# Altium PCB Whisper_pcb.PcbDoc (part 2 of 2)
Units mil, origin at the board's own origin, x right, y up, seen from the top; angles counter-clockwise.
Board outline 2755.91 x 3228.35 mil, 4 copper layers (Top Layer, GND, PWR, Bottom Layer), stack 23.756 mil thick; 209 components, 169 nets, 843 pads, 233 vias.
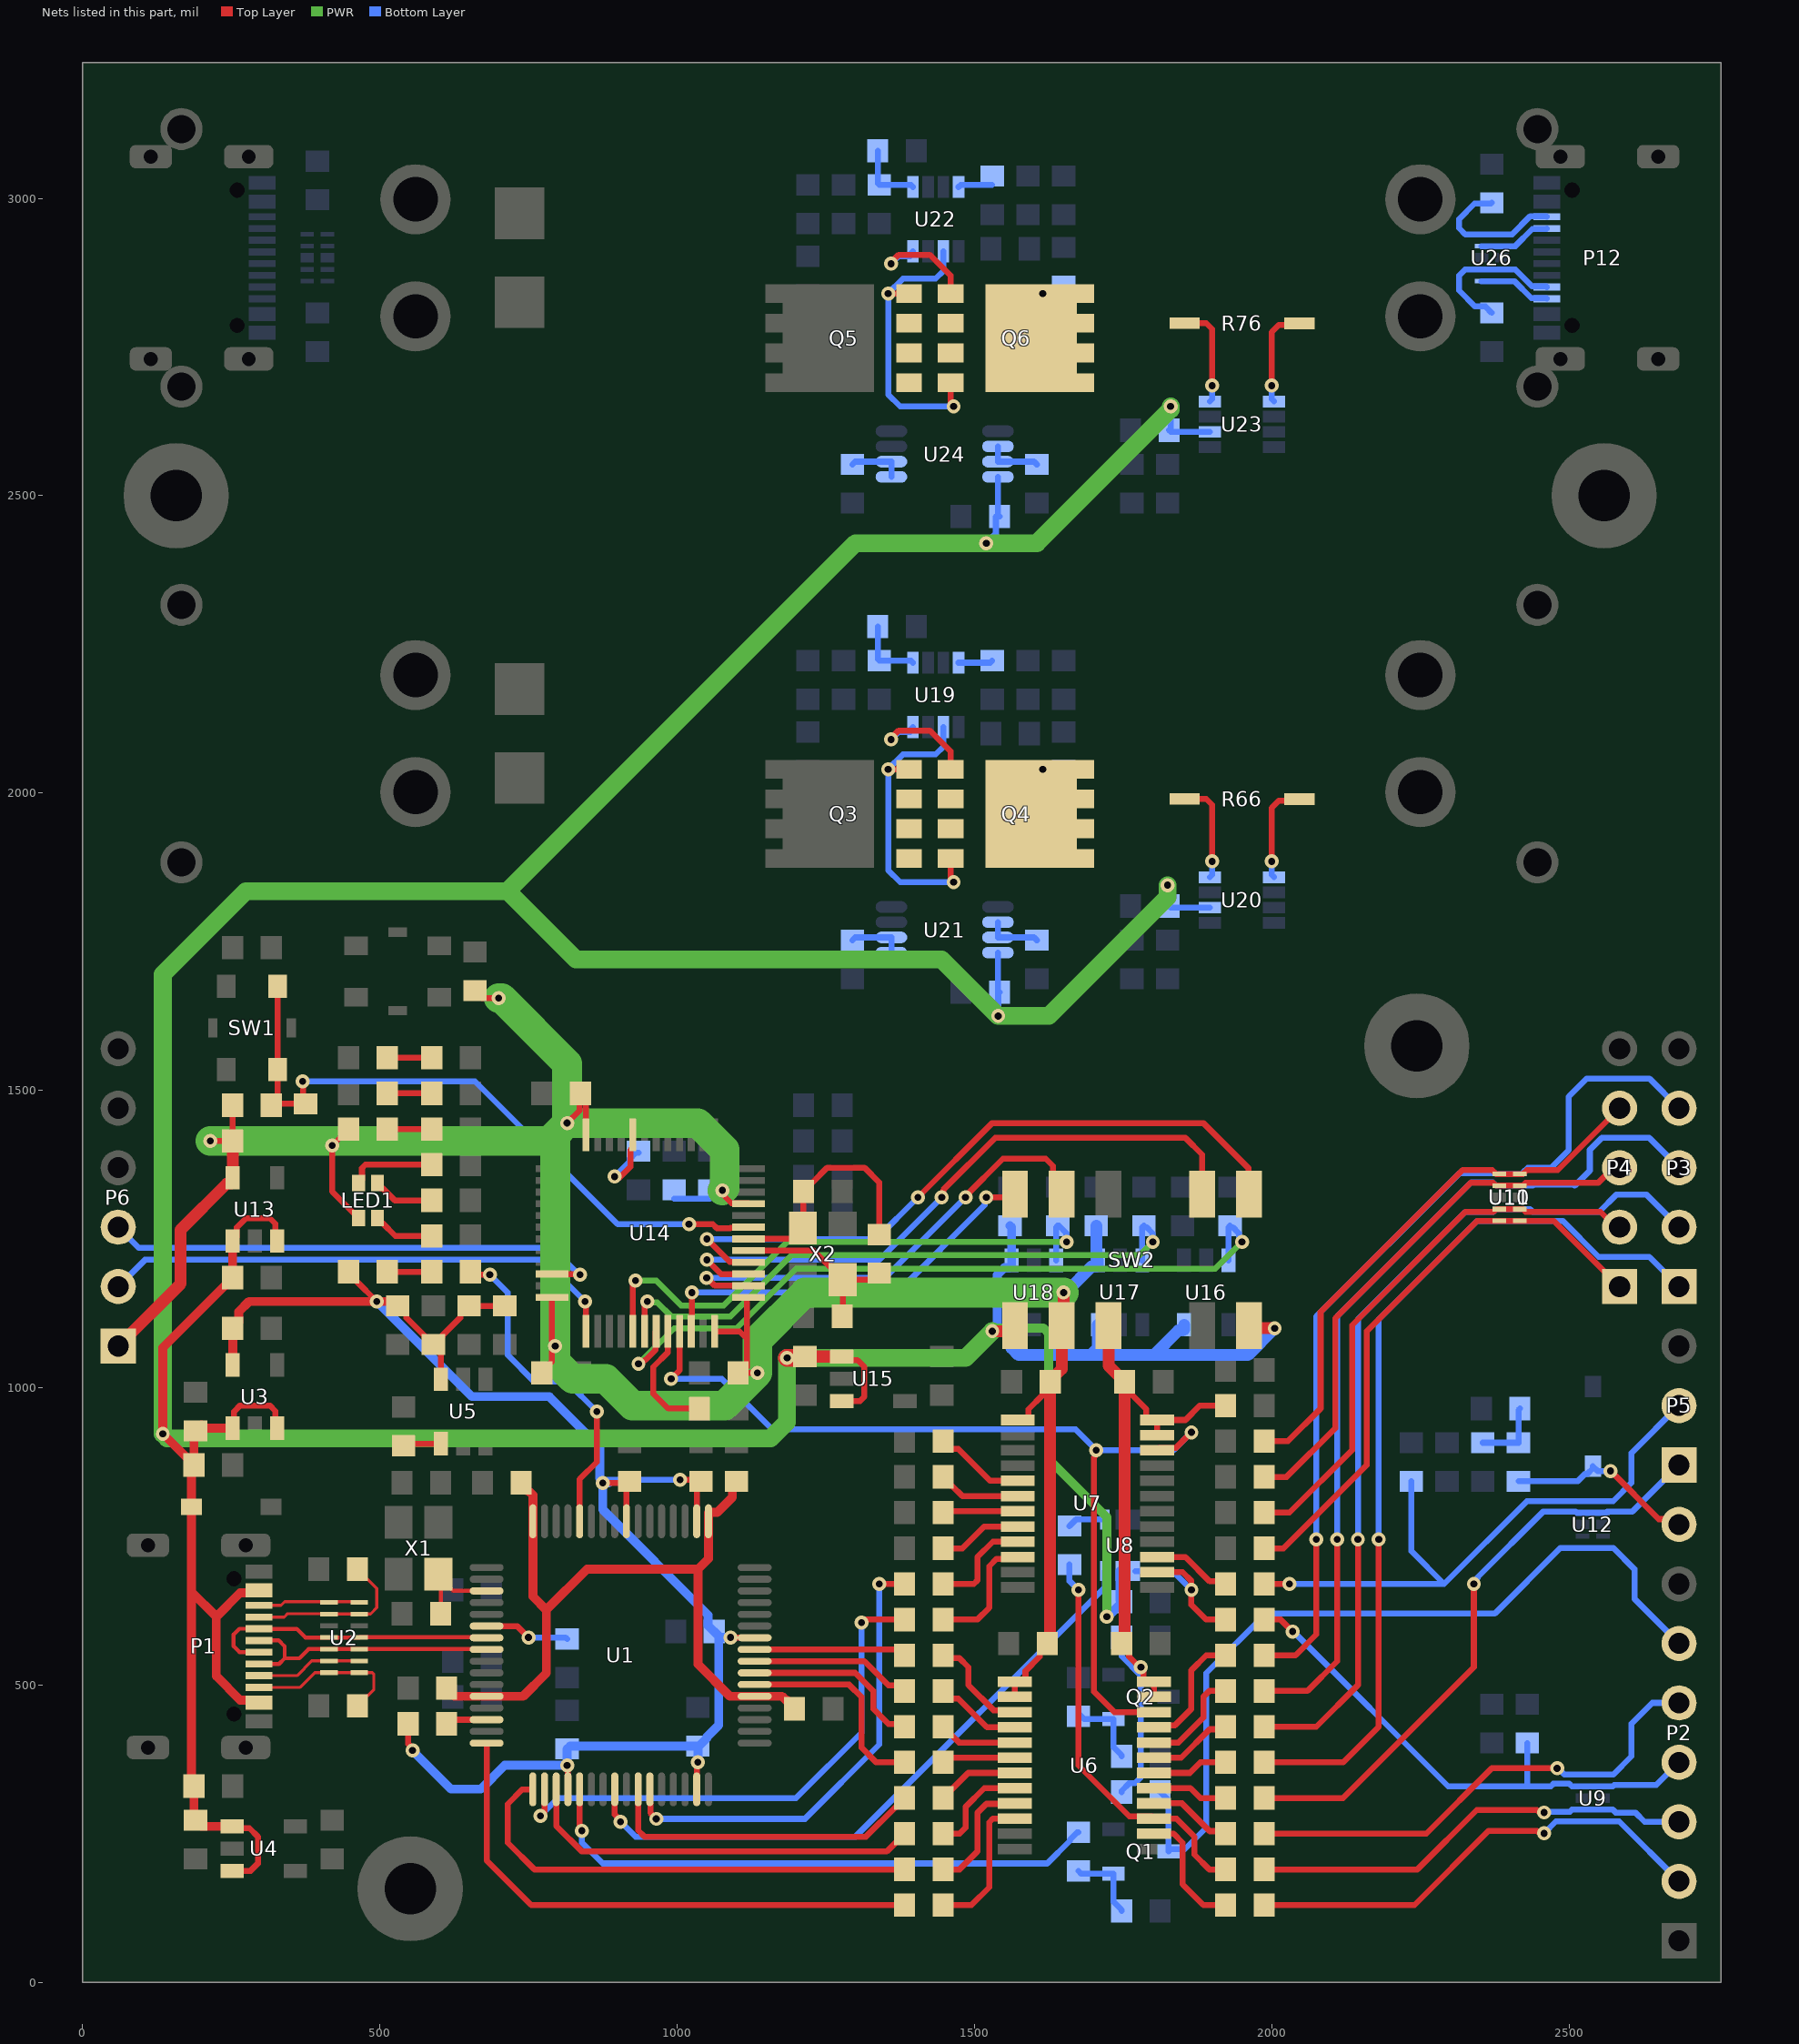
[diagram p4: the nets of this part, all layers, seen from the top]

## Via types
v1: diameter 23.62, hole 11.81, Top Layer to Bottom Layer, tented both sides, 232 vias
v2: diameter 19.68, hole 11.81, Top Layer to Bottom Layer, tented both sides, 1 vias

## Nets (pads, with @x,y where several pads share a name; then routed paths per layer and width w, separated by ;. In a path a pad name is that pad's centre, name@x,y a point inside that pad or via, vN(x,y) a via of type N, cw(c..) or ccw(c..) an arc to the next point about the centre after c; other vN are vias at no path point) (continued)
NetC4_1: C4.1 U1.3 X1.1 | length 146.6
  Top Layer w6.8: C4.1@602.48,620 602.48,677.51 X1.1@603.46,678.49 ; X1.1@603.46,681.69 X1.1@603.46,678.49 ; U1.3@679.61,658.27 623.69,658.27 X1.1@603.46,678.49
NetC45_1: C45.1 U19.4 | length 58
  Bottom Layer w10: U19.4@1473.39,2219.13 1526.65,2219.13 C45.1@1530,2222.48
NetC51_1: C51.1 U22.4 | length 58
  Bottom Layer w10: U22.4@1473.39,3019.13 1476.73,3022.48 C51.1@1530,3022.48
NetD2_2: D2.2 R8.1 | length 75
  Top Layer w10: D2.2@512.48,1195 R8.1@587.52,1195
NetD6_2: D6.2 R85.1 | length 75
  Top Layer w10: D6.2@512.48,1435 R85.1@587.52,1435
NetD7_1: D7.1 R87.1 | length 75
  Top Layer w10: D7.1@512.48,1555 R87.1@587.52,1555
NetD8_1: D8.1 R88.1 | length 75
  Top Layer w10: D8.1@512.48,1495 R88.1@587.52,1495
NetLED1_1: LED1.1 R82.1 | length 146.9
  Top Layer w10: LED1.1@464.25,1344.53 470,1350.28 470,1369.14 475.86,1375 R82.1@587.52,1375
NetLED1_2: LED1.2 R83.1 | length 105.7
  Top Layer w10: LED1.2@495.75,1344.53 495.75,1341.57 501.57,1335.75 504.53,1335.75 525.28,1315 R83.1@587.52,1315
NetLED1_3: LED1.3 R84.1 | length 106.1
  Top Layer w10: LED1.3@495.75,1285.47 495.75,1282.52 501.57,1276.69 504.53,1276.69 526.22,1255 R84.1@587.52,1255
NetP2_2: P2.2 R17.2 U9.1 U9.10 | length 801
  Top Layer w10: R17.2@1987.48,130 2240,130 2365,255 2445.52,255 2447.25,253.27 2455.58,253.27 v1(2458.19,250.66)
  Bottom Layer w10: v1(2458.19,250.66) 2478.16,270.63 U9.10@2557.13,270.63 2584.37,270.63 P2.2@2685,170
NetP2_3: P2.3 R18.2 U9.2 U9.9 | length 751.1
  Top Layer w10: R18.2@1987.48,190 2245,190 2345,290 2445.52,290 2447.25,288.27 2455.58,288.27 v1(2458.19,285.66)
  Bottom Layer w10: v1(2458.19,285.66) 2459.21,286.68 2501.39,286.68 2505.02,290.31 U9.9@2557.13,290.31 2573.84,290.31 2578.52,285.63 2611.63,285.63 2627.26,270 P2.3@2685,270
NetP2_5: P2.5 R20.2 U9.5 U9.6 | length 829.7
  Top Layer w10: R20.2@1987.48,250 2260,250 2370,360 v1(2480,360)
  Bottom Layer w10: v1(2480,360) 2482.04,360 2492.67,349.37 U9.5@2522.87,349.37 U9.6@2557.13,349.37 2574.37,349.37 2605,380 2605,435 2640,470 P2.5@2685,470
NetP3_1: P3.1 R21.2 U10.1 U10.10 | length 1521.8
  Top Layer w10: R21.2@1987.48,370 2120,370 2180,430 v1(2180,745)
  Bottom Layer w10: v1(2180,745) 2180,1115 2345.63,1280.63 U10.1@2382.87,1280.63 U10.10@2417.13,1280.63 2489.37,1280.63 2550,1220 2635,1220 P3.1@2685,1170
NetP3_2: P3.2 R22.2 U10.2 U10.9 | length 1455.3
  Top Layer w10: R22.2@1987.48,430 2075,430 2145,500 v1(2145,745)
  Bottom Layer w10: v1(2145,745) 2145,1115 2325.63,1295.63 2372.83,1295.63 2377.52,1300.31 U10.2@2382.87,1300.31 2383.19,1300 U10.9@2417.13,1300 ; U10.9@2417.13,1300.31 2434.69,1300.31 2439.37,1295.63 2550.63,1295.63 2580,1325 2630,1325 P3.2@2685,1270
NetP3_3: P3.3 R23.2 U10.4 U10.7 | length 1470.2
  Top Layer w10: R23.2@1987.48,490 2060,490 2110,540 v1(2110,745)
  Bottom Layer w10: v1(2110,745) 2110,1120 2335.43,1345.43 2371.77,1345.43 2377.52,1339.69 U10.7@2417.13,1339.69 2438.84,1339.69 2440.97,1341.81 2507.56,1341.81 2509.69,1339.69 2535,1365 2535,1400 2555,1420 2635,1420 P3.3@2685,1370
NetP3_4: P3.4 R24.2 U10.5 U10.6 | length 1488.3
  Top Layer w10: R24.2@1987.48,550 2040,550 2075,585 v1(2075,745)
  Bottom Layer w10: v1(2075,745) 2075,1120 2315.43,1360.43 2376.46,1360.43 2377.52,1359.37 2422.48,1359.37 2423.54,1360.43 2423.54,1362.65 2430.46,1369.57 2469.57,1369.57 2499.37,1399.37 2499.37,1489.37 2530,1520 2635,1520 P3.4@2685,1470
NetP4_1: P4.1 R25.2 U11.1 U11.10 | length 1003.2
  Top Layer w10: R25.2@1987.48,730 2020,730 2160,870 2160,1095 2345.63,1280.63 U11.10@2382.87,1280.63 U11.1@2417.13,1280.63 2474.37,1280.63 P4.1@2585,1170
NetP4_2: P4.2 R26.2 U11.2 U11.9 | length 944.5
  Top Layer w10: R26.2@1987.48,790 2030,790 2135.25,895.25 2135.25,1105.25 2325.63,1295.63 2372.83,1295.63 2377.52,1300.31 U11.9@2382.87,1300.31 U11.2@2417.13,1300.31 2422.48,1300.31 2427.17,1295.63 2552.98,1295.63 2578.61,1270 P4.2@2585,1270
NetP4_3: P4.3 R27.2 U11.4 U11.7 | length 925.2
  Top Layer w10: R27.2@1987.48,850 2025,850 2106.97,931.97 2106.97,1116.97 2334.37,1344.37 2372.63,1344.37 2377.31,1339.69 U11.7@2382.87,1339.69 U11.4@2417.13,1339.69 2422.48,1339.69 2427.17,1344.37 2548.98,1344.37 2574.61,1370 P4.3@2585,1370
NetP4_4: P4.4 R28.2 U11.5 U11.6 | length 930
  Top Layer w10: R28.2@1987.48,910 2027.22,910 2082.22,965 2082.22,1127.22 2321,1366 2370.89,1366 2377.52,1359.37 2422.48,1359.37 2429.11,1366 2481,1366 P4.4@2585,1470
NetP5_1: P5.1 R29.2 U12.4 U12.7 | length 1016.2
  Top Layer w10: R29.2@1987.48,310 2120,310 2340,530 v1(2340,670)
  Bottom Layer w10: v1(2340,670) 2340,673.69 2346.46,680.14 2346.46,681.46 2456.81,791.81 2510.96,791.81 2513.09,789.69 U12.4@2522.87,789.69 U12.7@2557.13,789.69 2562.48,789.69 2564.61,791.81 2606.81,791.81 P5.1@2685,870
NetQ1_1: Q1.1 R12.2 R14.2 | length 129.1
  Bottom Layer w10: R12.2@1675,187.52 1679.92,182.6 Q1.1@1733.74,182.6 1733.74,135.75 1747.52,121.97 R14.2@1747.52,120
NetQ2_1: Q2.1 R13.2 R15.2 | length 131.2
  Bottom Layer w10: R13.2@1675,452.52 1684.92,442.6 Q2.1@1733.74,442.6 1733.74,395.75 1747.52,381.97 R15.2@1747.52,380
NetQ3_1: Q3.1 Q4.1 U19.6 | length 506.9
  Top Layer w10: v1(1355,2040) Q3.1@1390.04,2040 ; Q4.1@1459.96,1890 1459.96,1858.73 1465,1853.69 v1(1465,1850)
  Bottom Layer w10: U19.6@1447.8,2110.87 1447.8,2077.8 1435,2065 1380,2065 v1(1355,2040) 1355,1870 1375,1850 v1(1465,1850)
NetQ3_2: Q3.2 Q4.2 U19.8 | length 203.9
  Top Layer w10: v1(1360,2090) 1360,2092.33 1372.67,2105 1425,2105 1459.96,2070.04 Q4.2@1459.96,2040
  Bottom Layer w10: v1(1360,2090) 1372.67,2102.63 1391.77,2102.63 1396.61,2107.47 U19.8@1396.61,2110.87 U19.8@1393.38,2107.63
NetQ4_3: Q4.3 R64.1 R66.1 | length 36
  Bottom Layer w10: v1(1615,2040) 1647.52,2040 R64.1@1650,2037.52
NetQ5_1: Q5.1 Q6.1 U22.6 | length 506.9
  Top Layer w10: v1(1355,2840) Q5.1@1390.04,2840 ; Q6.1@1459.96,2690 1459.96,2658.73 1465,2653.69 v1(1465,2650)
  Bottom Layer w10: U22.6@1447.8,2910.87 1447.8,2877.8 1435,2865 1380,2865 v1(1355,2840) 1355,2670 1375,2650 v1(1465,2650)
NetQ5_2: Q5.2 Q6.2 U22.8 | length 203.9
  Top Layer w10: v1(1360,2890) 1360,2892.33 1372.67,2905 1425,2905 1459.96,2870.04 Q6.2@1459.96,2840
  Bottom Layer w10: v1(1360,2890) 1372.67,2902.63 1391.77,2902.63 1396.61,2907.47 U22.8@1396.61,2910.87 U22.8@1393.38,2907.63
NetQ6_3: Q6.3 R74.1 R76.1 | length 36
  Bottom Layer w10: v1(1615,2840) 1647.52,2840 R74.1@1650,2837.52
NetR1_1: R1.1 U1.6 | length 144.4
  Top Layer w10: U1.6@679.61,599.21 730.79,599.21 v1(750,580)
  Bottom Layer w10: v1(750,580) 812.48,580 R1.1@815,577.48
NetR2_1: R2.1 U1.14 | length 69.9
  Top Layer w10: R2.1@612.48,435 619.21,441.73 U1.14@679.61,441.73
NetR8_2: R8.2 U1.60 | length 567.9
  Top Layer w10: R8.2@652.48,1195 657.48,1190 v1(685,1190) ; U1.60@836.1,775.39 836.1,846.1 865,875 v1(865,960)
  Bottom Layer w10: v1(685,1190) 715,1160 715,1055 760,1010 815,1010 v1(865,960)
NetR9_1: R9.1 U5.1 | length 64
  Top Layer w10: R9.1@540,902.52 543.35,905.87 U5.1@602.6,905.87
NetR16_2: R16.2 U8.1 | length 63.9
  Bottom Layer w10: R16.2@1660,767.48 1670.83,778.31 U8.1@1719.41,778.31
NetR31_2: R31.2 U6.3 | length 177.5
  Top Layer w10: R31.2@1447.48,550 1451.82,545.66 1474.34,545.66 1490,530 1490,500 1532.35,457.65 1564.79,457.65 U6.3@1567.87,454.57
NetR32_2: R32.2 U6.4 | length 145.9
  Top Layer w10: R32.2@1447.48,490 1447.48,489.67 1460.2,476.95 1473.05,476.95 1521.02,428.98 U6.4@1567.87,428.98
NetR33_2: R33.2 U6.5 | length 132.6
  Top Layer w10: R33.2@1447.48,430 1447.48,428.03 1460.2,415.31 1462.17,415.31 1474.09,403.39 U6.5@1567.87,403.39
NetR34_2: R34.2 U6.6 | length 123.6
  Top Layer w10: R34.2@1447.48,370 1455.28,377.8 U6.6@1567.87,377.8
NetR35_2: R35.2 U6.7 | length 139
  Top Layer w10: R35.2@1447.48,310 1447.48,311.97 1460.2,324.69 1462.17,324.69 1489.69,352.2 U6.7@1567.87,352.2
NetR36_2: R36.2 U6.8 | length 172.6
  Top Layer w10: R36.2@1447.48,250 1475,250 1485,260 1485,295 1516.61,326.61 U6.8@1567.87,326.61
NetR37_2: R37.2 U6.9 | length 204.5
  Top Layer w10: R37.2@1447.48,190 1475,190 1505,220 1505,285 1520.19,300.19 1567.04,300.19 U6.9@1567.87,301.02
NetR38_2: R38.2 U6.10 | length 244.7
  Top Layer w10: R38.2@1447.48,130 1495,130 1525,160 1525,269.33 1530.86,275.19 1567.63,275.19 U6.10@1567.87,275.43
NetR39_2: R39.2 U7.9 | length 177.7
  Top Layer w10: R39.2@1447.48,670 1499.14,670 1505,675.86 1505,715 1531.02,741.02 U7.9@1572.87,741.02
NetR40_2: R40.2 U7.10 | length 210.1
  Top Layer w10: R40.2@1447.48,610 1505,610 1525,630 1525,700 1537.35,712.35 1569.79,712.35 U7.10@1572.87,715.43
NetR41_2: R41.2 U7.5 | length 163.8
  Top Layer w10: R41.2@1447.48,910 1447.48,909.67 1460.2,896.95 1473.05,896.95 1500,870 1526.61,843.39 ; 1537.24,843.39 1526.61,843.39 ; U7.5@1572.87,843.39 1526.61,843.39
NetR42_2: R42.2 U7.6 | length 139.9
  Top Layer w10: R42.2@1447.48,850 1447.48,848.03 1460.2,835.31 1462.17,835.31 1479.69,817.8 U7.6@1572.87,817.8
NetR43_2: R43.2 U7.7 | length 126.3
  Top Layer w10: R43.2@1447.48,790 1449.69,792.2 U7.7@1572.87,792.2
NetR44_2: R44.2 U7.8 | length 140.6
  Top Layer w10: R44.2@1447.48,730 1480,730 1516.61,766.61 U7.8@1572.87,766.61
NetR45_1: R45.1 U14.20 | length 148.7
  Top Layer w10: v1(895,1355) 895.86,1354.14 904.14,1354.14 921.69,1371.69 921.69,1399.92 925.47,1403.7 U14.20@925.47,1425.35
  Bottom Layer w10: v1(895,1355) 920.31,1380.31 920.31,1384.76 930.55,1395 R45.1@935,1395
NetR46_1: R46.1 U14.44 | length 202.7
  Top Layer w10: U14.44@984.53,1094.65 984.53,1059.53 960,1035 960,990 985,965 R46.1@1037.52,965
NetR56_1: R56.1 R59.2 R86.2 | length 118.5
  Bottom Layer w10: R59.2@2355,907.48 R56.1@2415,907.48 2415,962.52 R86.2@2417.48,965
NetR62_2: R62.2 R63.1 U19.1 | length 116.5
  Bottom Layer w10: R63.1@1337.52,2280 1337.52,2224.96 R62.2@1340,2222.48 1393.27,2222.48 U19.1@1396.61,2219.13
NetR66_3: R66.3 U20.8 | length 173.9
  Top Layer w10: R66.3@1853.54,1990 1890,1990 1900,1980 v1(1900,1885)
  Bottom Layer w10: U20.8@1895.87,1858.39 1900,1862.52 v1(1900,1885)
NetR66_4: R66.4 U20.1 | length 171
  Top Layer w10: v1(2000,1885) 2000,1975 2012.26,1987.26 2044.44,1987.26 R66.4@2046.67,1989.5
  Bottom Layer w10: v1(2000,1885) 2000,1862.52 U20.1@2004.13,1858.39
NetR68_2: R68.2 U21.1 U21.2 | length 93
  Bottom Layer w10: R68.2@1295,1752.48 1299.72,1757.2 U21.2@1360.43,1757.2 U21.1@1360.43,1731.61
NetR69_2: R69.2 U21.6 U21.7 | length 93
  Bottom Layer w10: U21.6@1539.57,1782.8 U21.7@1539.57,1757.2 1600.28,1757.2 R69.2@1605,1752.48
NetR72_2: R72.2 R73.1 U22.1 | length 116.5
  Bottom Layer w10: R73.1@1337.52,3080 1337.52,3024.96 R72.2@1340,3022.48 1393.27,3022.48 U22.1@1396.61,3019.13
NetR76_3: R76.3 U23.8 | length 173.9
  Top Layer w10: R76.3@1853.54,2790 1890,2790 1900,2780 v1(1900,2685)
  Bottom Layer w10: U23.8@1895.87,2658.39 1900,2662.52 v1(1900,2685)
NetR76_4: R76.4 U23.1 | length 171
  Top Layer w10: v1(2000,2685) 2000,2775 2012.26,2787.26 2044.44,2787.26 R76.4@2046.67,2789.5
  Bottom Layer w10: v1(2000,2685) 2000,2662.52 U23.1@2004.13,2658.39
NetR78_2: R78.2 U24.1 U24.2 | length 93
  Bottom Layer w10: R78.2@1295,2552.48 1299.72,2557.2 U24.2@1360.43,2557.2 U24.1@1360.43,2531.61
NetR79_2: R79.2 U24.6 U24.7 | length 93
  Bottom Layer w10: U24.6@1539.57,2582.8 U24.7@1539.57,2557.2 1600.28,2557.2 R79.2@1605,2552.48
NRST: C27.2 R47.2 SW1.1 U14.7 | length 1152.1
  Top Layer w10: R47.2@317.48,1475 R47.2@319.96,1477.48 ; SW1.1@328.31,1674.88 SW1.1@328.31,1535.12 328.31,1485.83 R47.2@319.96,1477.48 ; v1(370,1515) 371.03,1513.97 371.03,1481.45 C27.2@375,1477.48 R47.2@319.96,1477.48 ; v1(1020,1275) 1060,1275 1066.59,1268.41 1089.28,1268.41 1089.81,1268.94 1119.45,1268.94 U14.7@1120.35,1269.84
  Bottom Layer w10: v1(370,1515) 660,1515 900,1275 v1(1020,1275)
OCC1: P12.A5 R90.1 U26.4 U26.7 | length 260
  Bottom Layer w10: R90.1@2370,2807.48 2359.43,2818.05 2341.95,2818.05 2315,2845 2315,2870 2325.31,2880.31 U26.7@2352.87,2880.31 U26.4@2387.13,2880.31 2409.69,2880.31 2438.31,2851.69 2462.09,2851.69 P12.A5@2462.99,2850.79
OCC2: P12.B5 R91.2 U26.1 U26.10 | length 246.9
  Bottom Layer w10: R91.2@2370,2992.52 2368.65,2991.17 2341.17,2991.17 2315,2965 2315,2950 2325.63,2939.37 U26.10@2352.87,2939.37 U26.1@2387.13,2939.37 2404.37,2939.37 2435,2970 2440.61,2970 2440.81,2969.8 2462.09,2969.8 P12.B5@2462.99,2968.9
OE: U6.22 U7.22 U14.45 | length 1616.3
  Top Layer w10: v1(990,1015) 1004.21,1029.21 U14.45@1004.21,1094.65 ; v1(1705,895) 1702.39,892.39 1702.39,883.83 1700.9,882.33 1700.9,489.1 1735.43,454.57 U6.22@1802.13,454.57 ; U7.22@1807.13,894.57 1810.98,898.43 1838.43,898.43 v1(1865,925)
  Bottom Layer w10: v1(990,1015) 1075,1015 1160,930 1670,930 v1(1705,895) 1835,895 v1(1865,925)
OSBU1: P12.A8 U26.2 U26.9 | length 122.3
  Bottom Layer w10: U26.9@2352.87,2919.69 U26.2@2387.13,2919.69 2409.69,2919.69 2438.31,2948.31 2462.09,2948.31 P12.A8@2462.99,2949.21
OSBU2: P12.B8 U26.5 U26.6 | length 122.3
  Bottom Layer w10: U26.6@2352.87,2860.63 U26.5@2387.13,2860.63 2408.16,2860.63 2436.78,2832.01 2462.09,2832.01 P12.B8@2462.99,2831.1
OUT0: R34.1 U1.38 | length 356.1
  Top Layer w10: U1.38@1130.39,500.79 1289.21,500.79 1310,480 1310,395 1335,370 R34.1@1382.52,370
OUT0_OUT: R21.1 U6.18 | length 127.8
  Top Layer w10: U6.18@1802.13,352.2 1862.2,352.2 1880,370 R21.1@1922.52,370
OUT1: R33.1 U1.39 | length 307.2
  Top Layer w10: U1.39@1130.39,520.47 1299.53,520.47 1330,490 1330,460 1355.66,434.34 1378.18,434.34 R33.1@1382.52,430
OUT1_OUT: R22.1 U6.19 | length 142
  Top Layer w10: U6.19@1802.13,377.8 1847.8,377.8 1895.66,425.66 1918.18,425.66 R22.1@1922.52,430
OUT2: R32.1 U1.40 | length 272.9
  Top Layer w10: U1.40@1130.39,540.16 1130.55,540 1315,540 1355.66,499.34 1373.18,499.34 R32.1@1382.52,490
OUT2_OUT: R23.1 U6.20 | length 176.8
  Top Layer w10: U6.20@1802.13,403.39 1843.39,403.39 1885,445 1885,480 1895,490 R23.1@1922.52,490
OUT3: R31.1 U1.41 | length 256.2
  Top Layer w10: U1.41@1130.39,559.84 1372.68,559.84 R31.1@1382.52,550
OUT3_OUT: R24.1 U6.21 | length 208.6
  Top Layer w10: U6.21@1802.13,428.98 1805.51,432.36 1837.36,432.36 1865,460 1865,525 1890,550 R24.1@1922.52,550
SWCLK: P6.2 U14.37 | length 883.7
  Top Layer w10: v1(845,1145) 846.73,1143.27 U14.37@846.73,1094.65
  Bottom Layer w10: P6.2@60,1170 105,1215 775,1215 v1(845,1145)
SWD_JTAG_SEL: U1.24 U8.6 | length 1084.5
  Top Layer w10: U1.24@895.16,324.61 895.16,282.15 905,272.31 v1(905,270)
  Bottom Layer w10: v1(905,270) 930,245 1300,245 1719.41,664.41 U8.6@1719.41,691.69
SWDIO: P6.3 U14.34 | length 857.6
  Top Layer w10: U14.34@789.65,1191.1 790.2,1190.55 836.26,1190.55 v1(836.81,1190)
  Bottom Layer w10: P6.3@60,1270 95,1235 790,1235 835,1190 v1(836.81,1190)
SYSRST: R12.1 U1.21 | length 963.6
  Top Layer w10: U1.21@836.1,324.61 836.1,262.58 840,258.69 v1(840,255)
  Bottom Layer w10: v1(840,255) 840,235 875,200 1622.52,200 1660.31,237.8 1660.31,239.76 1673.03,252.48 R12.1@1675,252.48
SYSRST_OUT: P2.6 Q1.3 R10.1 U12.1 U12.10 | length 1424.1
  Bottom Layer w10: R10.1@1812.48,320 1825.2,307.28 1825.2,300.52 1826.26,299.46 Q1.3@1826.26,220 1830.25,223.99 1853.99,223.99 1890,260 1890,520 1990,620 2375,620 2485.63,730.63 U12.1@2522.87,730.63 U12.10@2557.13,730.63 2574.37,730.63 2610,695 2610,645 P2.6@2685,570
TCK_SWCLK: R38.1 U1.16 | length 931.3
  Top Layer w10: U1.16@679.61,402.36 679.61,205 754.61,130 R38.1@1382.52,130
TCK_SWCLK_OUT: R17.1 U6.14 | length 211.2
  Top Layer w10: U6.14@1802.13,249.84 1802.28,250 1835,250 1850,235 1850,165 1885,130 R17.1@1922.52,130
TDI: R37.1 U1.17 | length 803.7
  Top Layer w10: U1.17@757.36,324.61 739.61,324.61 715,300 715,235 760,190 R37.1@1382.52,190
TDI_OUT: R16.1 R18.1 U6.15 | length 681.3
  Top Layer w10: v1(1675,660) 1675,365 1760.71,279.29 1798.27,279.29 1802.37,275.19 1839.81,275.19 1870,245 1870,215 1895,190 R18.1@1922.52,190
  Bottom Layer w10: R16.1@1660,702.52 1660,675 v1(1675,660)
TDO_SWDIO: R40.1 U1.18 | length 905.1
  Top Layer w10: v1(770,280) 777.05,287.05 U1.18@777.05,324.61 ; v1(1310,605) 1313.69,605 1318.69,610 R40.1@1382.52,610
  Bottom Layer w10: v1(770,280) 800,310 1200,310 1310,420 v1(1310,605)
TDO_SWDIO_IN: R19.1 U7.14 U8.4 | length 279.4
  Top Layer w10: U7.14@1807.13,689.84 1850.16,689.84 1865,675 v1(1865,660) 1865,635 1890,610 R19.1@1922.52,610
  Bottom Layer w10: U8.4@1770.59,691.69 1833.31,691.69 v1(1865,660)
TDO_SWDIO_SENS: P2.4 R19.2 R54.2 U9.4 U9.7 | length 906.3
  Top Layer w10: R19.2@1987.48,610 2015,610 v1(2035,590)
  Bottom Layer w10: v1@2035.69,590.69 2296.69,329.69 2430,329.69 ; R54.2@2430,402.52 2430,329.69 ; P2.4@2685,370 2646.81,331.81 2575.97,331.81 2573.84,329.69 2504.69,329.69 2500.43,333.94 2473.76,333.94 2469.51,329.69 2430,329.69
TMS: R36.1 U1.19 | length 677.5
  Top Layer w10: U1.19@796.73,324.61 796.73,263.27 840,220 1352.52,220 R36.1@1382.52,250
TMS_OUT: R20.1 U6.16 | length 141.5
  Top Layer w10: U6.16@1802.13,301.02 1848.98,301.02 1895.66,254.34 1918.18,254.34 R20.1@1922.52,250
UART_RX: R39.1 U1.27 | length 793.4
  Top Layer w10: U1.27@954.21,324.61 954.56,324.26 954.56,300.34 955,299.9 955,285 v1(965,275) ; v1(1340,670) R39.1@1382.52,670
  Bottom Layer w10: v1(965,275) 1215,275 1340,400 v1(1340,670)
UART_RX_IN: R30.1 U7.15 | length 134.2
  Top Layer w10: U7.15@1807.13,715.43 1807.37,715.19 1844.81,715.19 1845,715 1855,715 1895.66,674.34 1918.18,674.34 R30.1@1922.52,670
UART_RX_SENS: P5.2 R30.2 R55.2 U12.5 U12.6 | length 1046.4
  Top Layer w10: R30.2@1987.48,670 v1(2030,670)
  Bottom Layer w10: v1(2030,670) 2290,670 ; R55.2@2235,842.52 2235,725 2290,670 ; P5.2@2685,970 2605,890 2605,840 2574.37,809.37 U12.6@2557.13,809.37 U12.5@2522.87,809.37 2429.37,809.37 2290,670
UART_TX: R35.1 U1.26 | length 549.5
  Top Layer w10: U1.26@934.53,324.61 934.53,255.47 945,245 1317.52,245 1367.83,295.31 1369.8,295.31 1382.52,308.03 R35.1@1382.52,310
UART_TX_OUT: R29.1 U6.17 | length 127.3
  Top Layer w10: U6.17@1802.13,326.61 1863.39,326.61 1880,310 R29.1@1922.52,310
USB_CC1: P1.A5 R3.2 U2.6 U2.9 | length 284.7
  Top Layer w5: P1.A5@297.01,614.21 339.21,614.21 345,620 413.98,620 U2.9@414.61,619.37 U2.6@465.39,619.37 465.56,619.54 484.54,619.54 495,630 495,662.48 479.67,677.81 477.7,677.81 462.48,693.03 R3.2@462.48,695
USB_CC2: P1.B5 R7.2 U2.1 U2.14 | length 270.1
  Top Layer w5: P1.B5@297.01,496.1 366.1,496.1 390.94,520.94 U2.14@414.61,520.94 U2.1@465.39,520.94 487.07,520.94 490,518.02 490,492.52 479.67,482.19 477.7,482.19 462.48,466.97 R7.2@462.48,465
USB_D_N: P1.A7 P1.B7 U1.7 U2.4 U2.11 | length 502.8
  Top Layer w6.8: P1.B7@297.01,594.53 360.47,594.53 375,580 U2.11@414.61,580 U2.4@465.39,580 ; P1.A7@297.17,555.31 P1.A7@297.01,555.16 264.17,555.16 254.17,565.16 254.17,585.16 263.7,594.69 P1.B7@297.17,594.69 ; U2.4@465.72,580.32 678.81,580.32 U1.7@679.61,579.53
USB_D_P: P1.A6 P1.B6 U1.8 U2.3 U2.12 | length 460.3
  Top Layer w6.8: P1.B6@297.01,535.47 330.47,535.47 340,545 ; P1.A6@297.01,574.84 297.17,575 330,575 340,565 340,545 ; U1.8@679.61,559.84 679.13,560.31 U2.3@465.39,560.31 U2.12@414.61,560.31 380.31,560.31 365,545 340,545
USB_SBU1: P1.A8 U2.2 U2.13 | length 178.7
  Top Layer w5: P1.A8@297.01,515.79 360.79,515.79 385.63,540.63 U2.13@414.61,540.63 U2.2@465.39,540.63
USB_SBU2: P1.B8 U2.7 U2.8 | length 171.3
  Top Layer w5: P1.B8@297.01,633.9 333.9,633.9 340,640 464.45,640 U2.7@465.39,639.06
VBUS: C2.2 C5.2 C10.2 C24.1 C25.2 C35.2 C39.1 C47.2 C53.2 C55.2 C56.2 C58.2 D1.2 P1.A4 P1.A9 P1.B4 P1.B9 SW2.5 U3.1 U3.3 U4.1 U4.3 U8.5 U13.1 U13.3 U15.1 U15.3 U18.1 U20.6 U21.8 U23.6 U24.8 | length 9319.5
  Top Layer w10: U4.3@251.85,187.6 282.6,187.6 295,200 295,245 280.68,259.32 254.93,259.32 U4.1@251.85,262.4 ; U13.1@252.52,1246.77 U13.1@252.6,1246.85 259.41,1253.66 259.41,1269.41 275,1285 315,1285 324.32,1275.68 324.32,1249.93 U13.3@327.4,1246.85 ; U3.1@252.6,931.85 255,934.25 255,960 265,970 315,970 324.32,960.68 324.32,934.93 U3.3@327.4,931.85 ; U15.3@1276.85,977.6 1307.6,977.6 1315,985 1315,1035 1303.58,1046.42 1282.83,1046.42 U15.1@1276.85,1052.4
  Top Layer w15: C5.2@200.08,937.6 C5.2@194.33,931.85 ; U4.1@251.85,262.4 200.08,262.4 C10.2@190,272.48 187.52,274.96 C58.2@187.52,330 183.07,334.45 183.07,656.93 ; U13.1@252.52,1246.77 C25.2@252.52,1185 252.52,1183.03 242.3,1172.81 240.33,1172.81 135,1067.48 v1(135,922.52) 175.33,882.19 177.3,882.19 C2.2@187.52,871.97 ; U3.1@252.6,931.85 C5.2@194.33,931.85 ; P1.B4@297.01,474.45 296.67,474.79 265.21,474.79 225,515 225,615 ; P1.B9@297.01,655.55 296.63,655.18 265.18,655.18 225,615 ; 183.07,656.93 D1.2@183.07,800 183.07,865.55 C2.2@187.52,870 C2.2@187.52,871.97 ; 183.07,656.93 225,615 ; C2.2@187.52,871.97 187.52,925.04 C5.2@190,927.52 C5.2@194.33,931.85
  Top Layer w20: C35.2@1215,1052.48 1215.08,1052.4 U15.1@1276.85,1052.4 ; v1(1530,1095) 1563.39,1095 SW2.5@1568.15,1099.76
  Top Layer w30: v1(1185,1050) 1212.68,1050 C35.2@1215.08,1052.4
  PWR w15: v1(1530,1095) 1532.33,1095 1537.33,1100 1616.21,1100 1625,1091.21 1625,880 1722.71,782.29 v1(1722.71,614.92)
  PWR w30: v1(1530,1095) 1485,1050 v1(1185,1050) 1185,942.57 1157.43,915 142.52,915 v1(135,922.52) 135,1695 275,1835 715,1835 ; v1(1825,1845) 1825,1825 1625,1625 v1(1540,1625) 1445,1720 830,1720 715,1835 ; v1(1830,2650) 1830,2645 1605,2420 v1(1520,2420) 1300,2420 715,1835
  Bottom Layer w10: v1(1520,2420) 1536.17,2436.17 1536.17,2464.52 C56.2@1539.57,2467.91 ; U21.8@1539.57,1731.61 1539.57,1667.91 C55.2@1540,1667.48 ; U24.8@1539.57,2531.61 C56.2@1539.57,2467.91 ; v1(1540,1625) C55.2@1540,1667.48 ; C55.2@1542.48,1665 C55.2@1540,1667.48 ; C56.2@1542.48,2465 C56.2@1539.57,2467.91 ; v1(1825,1845) 1825,1812.48 C47.2@1827.48,1810 1830.28,1807.2 U20.6@1895.87,1807.2 ; v1(1830,2650) 1830,2612.52 C53.2@1827.48,2610 1830.28,2607.2 U23.6@1895.87,2607.2
  Bottom Layer w15: v1(1530,1095) 1530,1097.33 1538.29,1105.62 1538.29,1189.82 1550.41,1201.95 1558.29,1201.95 1562.6,1206.26 1562.6,1269.92 C39.1@1560,1272.52 ; v1(1722.71,614.92) 1724.41,614.92 1747.52,638.03 C24.1@1747.52,640 1745,642.52 U8.5@1745,691.69
VBUS_SEL: SW2.10 U14.46 | length 681.2
  Top Layer w10: U14.46@1023.9,1094.65 1024.8,1095.55 1024.8,1121.94 1025,1122.14 v1(1025,1160) ; v1(1520,1320) 1520.24,1320.24 SW2.10@1568.15,1320.24
  Bottom Layer w10: v1(1025,1160) 1370,1160 1517.39,1307.39 1517.39,1317.39 v1(1520,1320)
VBUS_SW: R53.1 U14.41 U18.3 | length 968.1
  Top Layer w10: U14.41@925.47,1094.65 925.47,1171.79 930,1176.31 v1(930,1180)
  PWR w10: v1(930,1180) 965,1180 1006.81,1138.19 1078.19,1138.19 1185,1245 v1(1655,1245)
  Bottom Layer w10: U18.3@1637.4,1214.13 1637.4,1269.92 R53.1@1640,1272.52 1641.97,1272.52 1654.69,1259.8 1654.69,1245.31 v1(1655,1245)
VCC: C20.2 C22.2 C26.2 C29.2 C30.2 C31.2 C32.2 C33.2 C38.1 D6.1 LED1.4 P6.1 R47.1 R89.1 SW2.4 U6.1 U6.2 U7.1 U13.5 U14.1 U14.9 U14.24 U14.36 U14.48 U17.1 | length 4955.2
  Top Layer w10: v1(215,1415) C26.2@252.52,1415 ; R47.1@252.52,1475 C26.2@252.52,1415 ; C26.2@252.6,1414.92 C26.2@252.52,1415 ; D6.1@447.52,1435 447.52,1433.03 434.8,1420.31 432.83,1420.31 v1(420,1407.48) 420,1329.72 455.47,1294.25 458.43,1294.25 464.25,1288.43 LED1.4@464.25,1285.47 ; R89.1@660,1667.52 672.52,1655 v1(700,1655) ; U14.36@789.65,1151.73 789.65,1079.04 795,1073.69 795,1066.31 789.65,1060.96 789.65,1044.09 C30.2@777.84,1032.29 ; v1(815,1445) 836.17,1466.17 836.17,1493.69 C31.2@837.48,1495 846.73,1485.75 U14.24@846.73,1425.35 ; U14.48@1063.27,1094.65 1105.35,1094.65 1117.48,1082.52 ; v1(1075.98,1331.81) 1078.59,1329.2 1078.59,1323.05 1091.53,1310.12 1119.45,1310.12 U14.9@1120.35,1309.21 ; C29.2@1102.48,1025 v1(1135,1025) ; C29.2@1117.48,1035 1117.48,1082.52 ; U14.1@1120.35,1151.73 1118.39,1151.73 1117.48,1150.83 1117.48,1082.52 ; U6.2@1567.87,480.16 U6.1@1567.87,505.75 1582.02,505.75 1585.87,509.61 1585.87,523.75 1609.76,547.64 1609.76,557.28 C20.2@1622.48,570 ; U7.1@1572.87,945.75 1587.02,945.75 1590.87,949.61 1590.87,963.75 1614.76,987.64 1614.76,997.28 C22.2@1627.48,1010 ; C30.2@772.52,1026.97 C30.2@777.84,1032.29 ; C30.2@772.52,1026.97 C30.2@772.52,1025 C30.2@772.52,1026.97 ; C30.2@772.52,1026.97 C30.2@777.84,1032.29
  Top Layer w20: P6.1@60,1070 165,1175 165,1265.55 242.91,1343.46 250.79,1343.46 252.6,1345.28 U13.5@252.6,1353.15 C26.2@252.6,1414.92 ; C20.2@1622.48,570 1627.48,575 C22.2@1627.48,1010 1627.48,1011.97 1646.89,1031.38 1646.89,1099.76 1650,1102.87 v1(1650,1160)
  PWR w50: v1(215,1415) 420,1415 785,1415 795,1425 ; v1(700,1655) 705,1655 815,1545 v1(815,1445) ; v1(1075.98,1331.81) 1080,1335.83 1080,1400 1035,1445 v1(815,1445) ; v1(1650,1160) 1215,1160 1135,1080 v1(1135,1025) 1080,970 925,970 880,1015 824.29,1015 795,1044.29 v1(795,1070) 795,1425 ; 795,1425 v1(815,1445)
  Bottom Layer w10: C33.2@995,1317.52 1055,1317.52 1067.72,1330.24 1074.41,1330.24 v1(1075.98,1331.81)
  Bottom Layer w20: v1(1650,1160) 1650.69,1160.69 1654.16,1160.69 1697.91,1204.45 1705.79,1204.45 1707.6,1206.26 U17.1@1707.6,1214.13 1705.79,1215.94 1705.79,1227.44 1705,1228.23 C38.1@1705,1272.52
VCC18_SEL: SW2.7 U14.3 | length 1087.4
  Top Layer w10: v1(1050,1215) 1073.9,1191.1 U14.3@1120.35,1191.1 ; v1(1445,1320) 1447.61,1322.61 1447.61,1332.61 1535,1420 1855,1420 1883.11,1391.89 SW2.7@1883.11,1320.24
  Bottom Layer w10: v1(1050,1215) 1340,1215 v1(1445,1320)
VCC18_SW: R51.1 U14.43 U16.3 | length 1267.8
  Top Layer w10: v1(935,1040) 938.69,1040 945.14,1046.46 946.46,1046.46 963.94,1063.94 963.94,1093.74 U14.43@964.84,1094.65
  PWR w10: v1(935,1040) 995,1100 1100,1100 1200,1200 1905,1200 v1(1950,1245)
  Bottom Layer w10: U16.3@1927.4,1214.13 R51.1@1927.4,1269.92 ; R51.1@1930,1272.52 R51.1@1927.4,1269.92 ; v1(1950,1245) 1950,1248.69 1944.69,1254 1944.69,1259.8 1934.57,1269.92 R51.1@1927.4,1269.92
VCC33_SEL: SW2.9 U14.2 | length 806.8
  Top Layer w10: v1(1049.58,1184.58) 1050.42,1184.58 1063.58,1171.42 U14.2@1120.35,1171.42 ; v1(1485,1320) 1485,1322.08 1547.92,1385 1620,1385 1632.21,1372.79 1632.21,1334.92 SW2.9@1646.89,1320.24
  Bottom Layer w10: v1(1049.58,1184.58) 1349.58,1184.58 v1(1485,1320)
VCC33_SW: R52.1 U14.42 U17.3 | length 1060.4
  Top Layer w10: U14.42@945.16,1094.65 945.16,1140.16 v1(950,1145)
  PWR w10: v1(950,1145) 951.46,1143.54 966.46,1143.54 990,1120 1090,1120 1193.19,1223.19 1778.19,1223.19 v1(1800,1245)
  Bottom Layer w10: U17.3@1782.4,1214.13 R52.1@1782.4,1269.92 ; R52.1@1785,1272.52 R52.1@1782.4,1269.92 ; v1(1800,1245) 1799.69,1245.31 1799.69,1259.8 1789.57,1269.92 R52.1@1782.4,1269.92
VCC_AUTO: SW2.1 U16.6 U17.6 U18.6 | length 680.6
  Top Layer w20: SW2.1@1961.85,1099.76 1962.09,1100 v1(2005,1100)
  Bottom Layer w20: U18.6@1562.6,1105.87 1562.6,1066.72 1574.31,1055 1695.88,1055 ; U17.6@1707.6,1105.87 1707.6,1066.72 1695.88,1055 ; U16.6@1852.6,1105.87 1852.6,1097.99 1850.79,1096.18 1842.91,1096.18 1801.73,1055 ; v1(2005,1100) 1960,1055 1801.73,1055 ; 1695.88,1055 1801.73,1055
VCC_AUTO_SEL: SW2.6 U14.4 | length 1159
  Top Layer w10: v1(1050,1250) 1088.31,1211.69 1119.45,1211.69 U14.4@1120.35,1210.79 ; v1(1405,1320) 1530,1445 1885,1445 1961.25,1368.75 1961.25,1320.84 SW2.6@1961.85,1320.24
  Bottom Layer w10: v1(1050,1250) 1335,1250 v1(1405,1320)
VCC_PORT: C21.1 C23.1 R10.2 R11.2 R49.2 SW2.3 U6.23 U6.24 U7.23 U7.24 | length 1217.7
  Top Layer w10: C21.1@1747.52,570 1760.24,557.28 1760.24,547.64 1784.13,523.75 1784.13,509.61 1787.98,505.75 U6.24@1802.13,505.75 U6.23@1802.13,480.16 ; C23.1@1752.52,1010 1765.24,997.28 1765.24,987.64 1789.13,963.75 1789.13,949.61 1792.98,945.75 U7.24@1807.13,945.75 ; U7.23@1807.13,920.16 U7.24@1807.13,945.75 ; R49.2@1922.52,970 1879.15,970 1854.9,945.75 U7.24@1807.13,945.75
  Top Layer w20: SW2.3@1725.63,1099.76 1725.63,1036.89 1742.83,1019.69 1744.8,1019.69 1752.52,1011.97 C23.1@1752.52,1010 1752.52,575 C21.1@1747.52,570
  Bottom Layer w10: R10.2@1747.52,320 1747.52,321.97 1760.24,334.69 1769.69,334.69 1780,345 1780,515.8 ; R11.2@1747.52,580 1747.52,548.28 1780,515.8 ; v1(1780,530) 1780,515.8
VCCIO: C6.2 C15.2 C16.2 C17.2 C18.2 C19.2 C57.1 D2.1 R2.2 R4.1 R5.1 R6.1 U1.20 U1.31 U1.42 U1.50 U1.56 U3.5 U5.6 | length 2951.4
  Top Layer w10: D2.1@447.52,1195 460.24,1182.28 460.24,1179.76 v1(495,1145) ; R4.1@530,1137.48 531.97,1137.48 544.69,1124.76 544.69,1117.83 575.31,1087.2 575.31,1085.24 588.03,1072.52 C19.2@590,1072.52 591.97,1072.52 604.69,1085.24 604.69,1087.2 635.31,1117.83 635.31,1124.76 648.03,1137.48 R6.1@650,1137.48 R5.1@710,1137.48 ; R2.2@547.52,435 547.52,401.17 555,393.69 v1(555,390) ; C19.2@597.52,1075 602.6,1069.92 U5.6@602.6,1014.13 ; v1(815,365) 816.07,363.93 816.07,324.95 U1.20@816.42,324.61 ; v1(875,840) C16.2@917.48,840 ; U1.56@914.84,775.39 914.84,837.36 C16.2@917.48,840 ; C16.2@920,842.52 C16.2@917.48,840 ; v1(1005,845) 1037.52,845 C57.1@1040,842.52 1032.95,835.47 U1.50@1032.95,775.39 ; U1.31@1032.95,324.61 1032.95,367.95 v1(1035,370) ; v1(1090,580) 1090.24,579.76 1130.16,579.76 U1.42@1130.39,579.53
  Top Layer w15: U3.5@252.6,1038.15 252.6,1099.92 C6.2@252.52,1100 262.74,1110.22 262.74,1127.74 280,1145 v1(495,1145) 522.48,1145 R4.1@530,1137.48
  Bottom Layer w10: v1(875,840) v1@878.69,840 ; v1@883.69,845 v1(1005,845)
  Bottom Layer w15: v1(495,1145) 655,985 785,985 870,900 870,847.33 875,842.33 v1(875,840) 875,795 1052.26,617.74 1052.26,600.22 1070,582.48 C17.2@1070,580 ; v1(555,390) 620,325 670,325 710,365 v1(815,365) C15.2@815,392.52 820,397.52 C18.2@1035,397.52 ; v1@878.69,840 v1@885,840 ; v1(1035,370) C18.2@1035,397.52 ; v1(1090,580) C17.2@1070,580 ; C18.2@1035,397.52 1036.97,397.52 1049.69,410.24 1049.69,412.2 1070,432.52 C17.2@1070,580
VCORE: C1.2 C12.2 C13.2 C14.2 U1.12 U1.37 U1.49 U1.64 | length 1349.4
  Top Layer w15: C13.2@612.48,495 612.48,493.82 625.2,481.1 U1.12@679.61,481.1 741.1,481.1 780,520 780,626.38 ; C12.2@737.48,840 737.48,838.03 750.2,825.31 751.5,825.31 757.36,819.46 U1.64@757.36,775.39 757.36,649.02 780,626.38 ; C1.2@1100,842.52 1092.91,835.42 1092.91,815.66 1067.69,790.44 1053.47,790.44 1052.64,789.6 U1.49@1052.64,775.39 1052.64,712.64 1035,695 ; C14.2@1197.52,460 1197.52,461.97 1184.8,474.69 1182.83,474.69 1176.42,481.1 1088.9,481.1 1035,535 1035,695 ; 780,626.38 848.62,695 1035,695
VTref: D3.2 P2.8 R56.2 | length 323.5
  Top Layer w10: v1(2570,860) 2651.01,778.99 2676.01,778.99 P2.8@2685,770
  Bottom Layer w10: R56.2@2415,842.52 2514.45,842.52 2527.28,855.35 2531.22,855.35 2540,864.13 D3.2@2540,868.07 2548.07,860 v1(2570,860)
XTAL_IN: C28.2 R48.2 U14.5 X2.3 | length 308.7
  Top Layer w10: U14.5@1120.35,1230.47 1229.69,1230.47 1255.91,1204.25 1259.84,1204.25 1278.46,1185.63 X2.3@1278.46,1181.69 ; C28.2@1277.48,1120 1278.46,1120.98 X2.3@1278.46,1181.69 ; R48.2@1340,1192.52 1329.17,1181.69 X2.3@1278.46,1181.69
XTAL_OUT: C34.2 R48.1 U14.6 X2.1 | length 403.9
  Top Layer w10: U14.6@1120.35,1250.16 1193.39,1250.16 X2.1@1211.54,1268.31 1212.52,1269.29 C34.2@1212.52,1330 1212.52,1331.97 1225.24,1344.69 1227.2,1344.69 1252.52,1370 1315,1370 1340,1345 R48.1@1340,1257.48
pads on no net: P1. P9. P9.A6 P9.A7 P9.B6 P9.B7 P12. P12.A6 P12.A7 P12.B6 P12.B7 SW1. SW3. U1.23 U1.28 U1.29 U1.30 U1.32 U1.33 U1.34 U1.36 U1.53 U1.54 U1.55 U1.57 U1.58 U1.59 U3.4 U4.4 U7.3 U7.4 U7.20 U7.21 U8.3 U13.4 U14.29 U14.32 U14.33 U14.35 U14.38 U15.4 U16.4 U16.5 U17.4 U17.5 U18.4 U18.5 U19.3 U20.4 U22.3 U23.4

## Polygon pours and split planes (outlines as drawn)
GND on Top Layer "GND_L01_P002" (solid, pour order 2): 0,1771.65 0,0 2755.91,0 2755.91,1771.65
GND on Top Layer "GND_L01_P000" (solid, pour order 0): 0,2637.8 0,3169.29 2755.91,3169.29 2755.91,2637.8 2362.2,2637.8 2362.2,2933.07 452.76,2933.07 452.76,2637.8
GND on Top Layer "GND_L01_P001" (solid, pour order 1): 0,1837.8 0,2369.29 2755.91,2369.29 2755.91,1837.8 2362.2,1837.8 2362.2,2133.07 452.76,2133.07 452.76,1837.8
GND on Bottom Layer "GND_L04_P004" (solid, pour order 4): 0,0 2755.91,0 2755.91,1771.65 2047.24,1771.65 2047.24,3228.35 846.46,3228.35 846.46,1771.65 0,1771.65
GND on Bottom Layer "GND_L04_P007" (solid, pour order 7): 0,3228.35 624.96,3228.35 624.96,2618.11 0,2618.11
GND on Bottom Layer "GND_L04_P006" (solid, pour order 6): 2755.91,3228.35 2185.04,3228.35 2185.04,2618.11 2755.91,2618.11
GND on GND "GND_L02_P003" (solid, pour order 3): 0,0 2755.91,0 2755.91,1771.65 2047.24,1771.65 2047.24,3228.35 846.46,3228.35 846.46,1771.65 0,1771.65
GND on PWR "GND_L03_P005" (solid, pour order 5): 0,0 2755.91,0 2755.91,1771.65 2047.24,1771.65 2047.24,3228.35 846.46,3228.35 846.46,1771.65 0,1771.65

## Other copper
Top Layer:
  rectangle net EXT_IN2: 485,2655 1330,2875
  rectangle net GND: 485,2925 2340,3145
  rectangle net EXT_OUT2: 2085,2720 2340,2875
  rectangle net EXT_OUT1: 2085,1920 2340,2075
  rectangle net GND: 485,2125 2340,2345
  rectangle net EXT_IN1: 485,1855 1330,2075
  region net NetQ5_2: 1390,2670 1415,2670 1415,2695 1435,2715 1485,2715 1485,2860 1435,2860 1435,2835 1410,2810 1360,2810 1360,2670
  region net NetQ6_3: 1515,2875 1515,2650 1715,2650 1785,2720 1815,2720 1815,2875
  region net NetQ4_3: 1515,2075 1515,1850 1715,1850 1785,1920 1815,1920 1815,2075
  region net NetQ3_2: 1390,1870 1415,1870 1415,1895 1435,1915 1485,1915 1485,2060 1435,2060 1435,2035 1410,2010 1360,2010 1360,1870

## Silkscreen, mask and mechanical layers (free items; w line width, h text height)
Top Overlay:
  lines w10: 1045,2100 1125,2100 ; 1045,2900 1125,2900 ; 1085,2060 1125,2100 ; 1085,2140 1125,2100 ; 1085,2860 1125,2900 ; 1085,2940 1125,2900
  text "-" at 674.99,3096.66 h50 r90
  text "-" at 2135.01,3096.66 h50 r270
  text "PWR2" at 850,2875.01 h50
  text "+" at 674.99,2703.34 h50 r90
  text "+" at 2135.01,2703.34 h50 r270
  text "-" at 674.99,2296.66 h50 r90
  text "-" at 2135.01,2296.66 h50 r270
  text "PWR1" at 850,2075.01 h50
  text "+" at 674.99,1903.34 h50 r90
  text "+" at 2135.01,1903.34 h50 r270
  text "KEY" at 711.68,1680.01 h40
  text "FluxWhisper" at 1045.92,1673.34 h50
  text "RST" at 76.68,1660.01 h40
  text "IN" at 2610,1645 h50 r90
  text "OUT" at 2710,1645 h50 r90
  text "DataFlux" at 1116.73,1575.01 h50
  text "G" at 169.99,1556.67 h40 r90
  text "1" at 729.99,1548.34 h40 r90
  text "G" at 2514.99,1548.34 h50 r90
  text "Ver 0.1" at 1145.88,1490.01 h50
  text "2" at 729.99,1481.67 h40 r90
  text "3" at 2514.99,1448.34 h50 r90
  text "TX" at 169.99,1436.68 h40 r90
  text "S" at 729.99,1421.67 h40 r90
  text "5V" at 1671.88,1395 h50 r90
  text "3.3V" at 1750.62,1395 h50 r90
  text "1.8V" at 1829.36,1395 h50 r90
  text "AUTO" at 1908.1,1395 h50 r90
  text "2" at 2514.99,1348.34 h50 r90
  text "RX" at 169.99,1336.68 h40 r90
  text "1" at 2514.99,1256.67 h50 r90
  text "IO" at 169.99,1240.01 h40 r90
  text "D" at 729.99,1181.67 h40 r90
  text "0" at 2514.99,1148.34 h50 r90
  text "CK" at 169.99,1136.68 h40 r90
  text "V" at 169.99,1056.67 h40 r90
  text "GND" at 2486.71,1050.01 h50
  text "UART_RX" at 2286.77,954.17 h50
  text "UART_TX" at 2286.77,854.17 h50
  text "VT REF" at 2336.76,750.01 h50
  text "ARM_NTRST" at 2186.81,654.17 h50
  text "SYS RST" at 2286.77,550.01 h50
  text "TMS" at 2486.71,450.01 h50
  text "TDO/SWDIO" at 2195.14,350.01 h50
  text "TDI" at 2503.37,250.01 h50
  text "TCK/SCLK" at 2236.79,150.01 h50
  text "GND" at 2486.71,50.01 h50
Mechanical 1:
  the board outline again, w10